# Altium PCB 2026.11.05.HMS.PD.CNHH.V5.1.PcbDoc (part 1 of 4)
Units mm, origin at the board's own origin, x right, y up, seen from the top; angles counter-clockwise.
Board outline 110 x 110 mm, 2 copper layers (Top Layer, Bottom Layer); 170 components, 117 nets, 610 pads, 1348 vias.
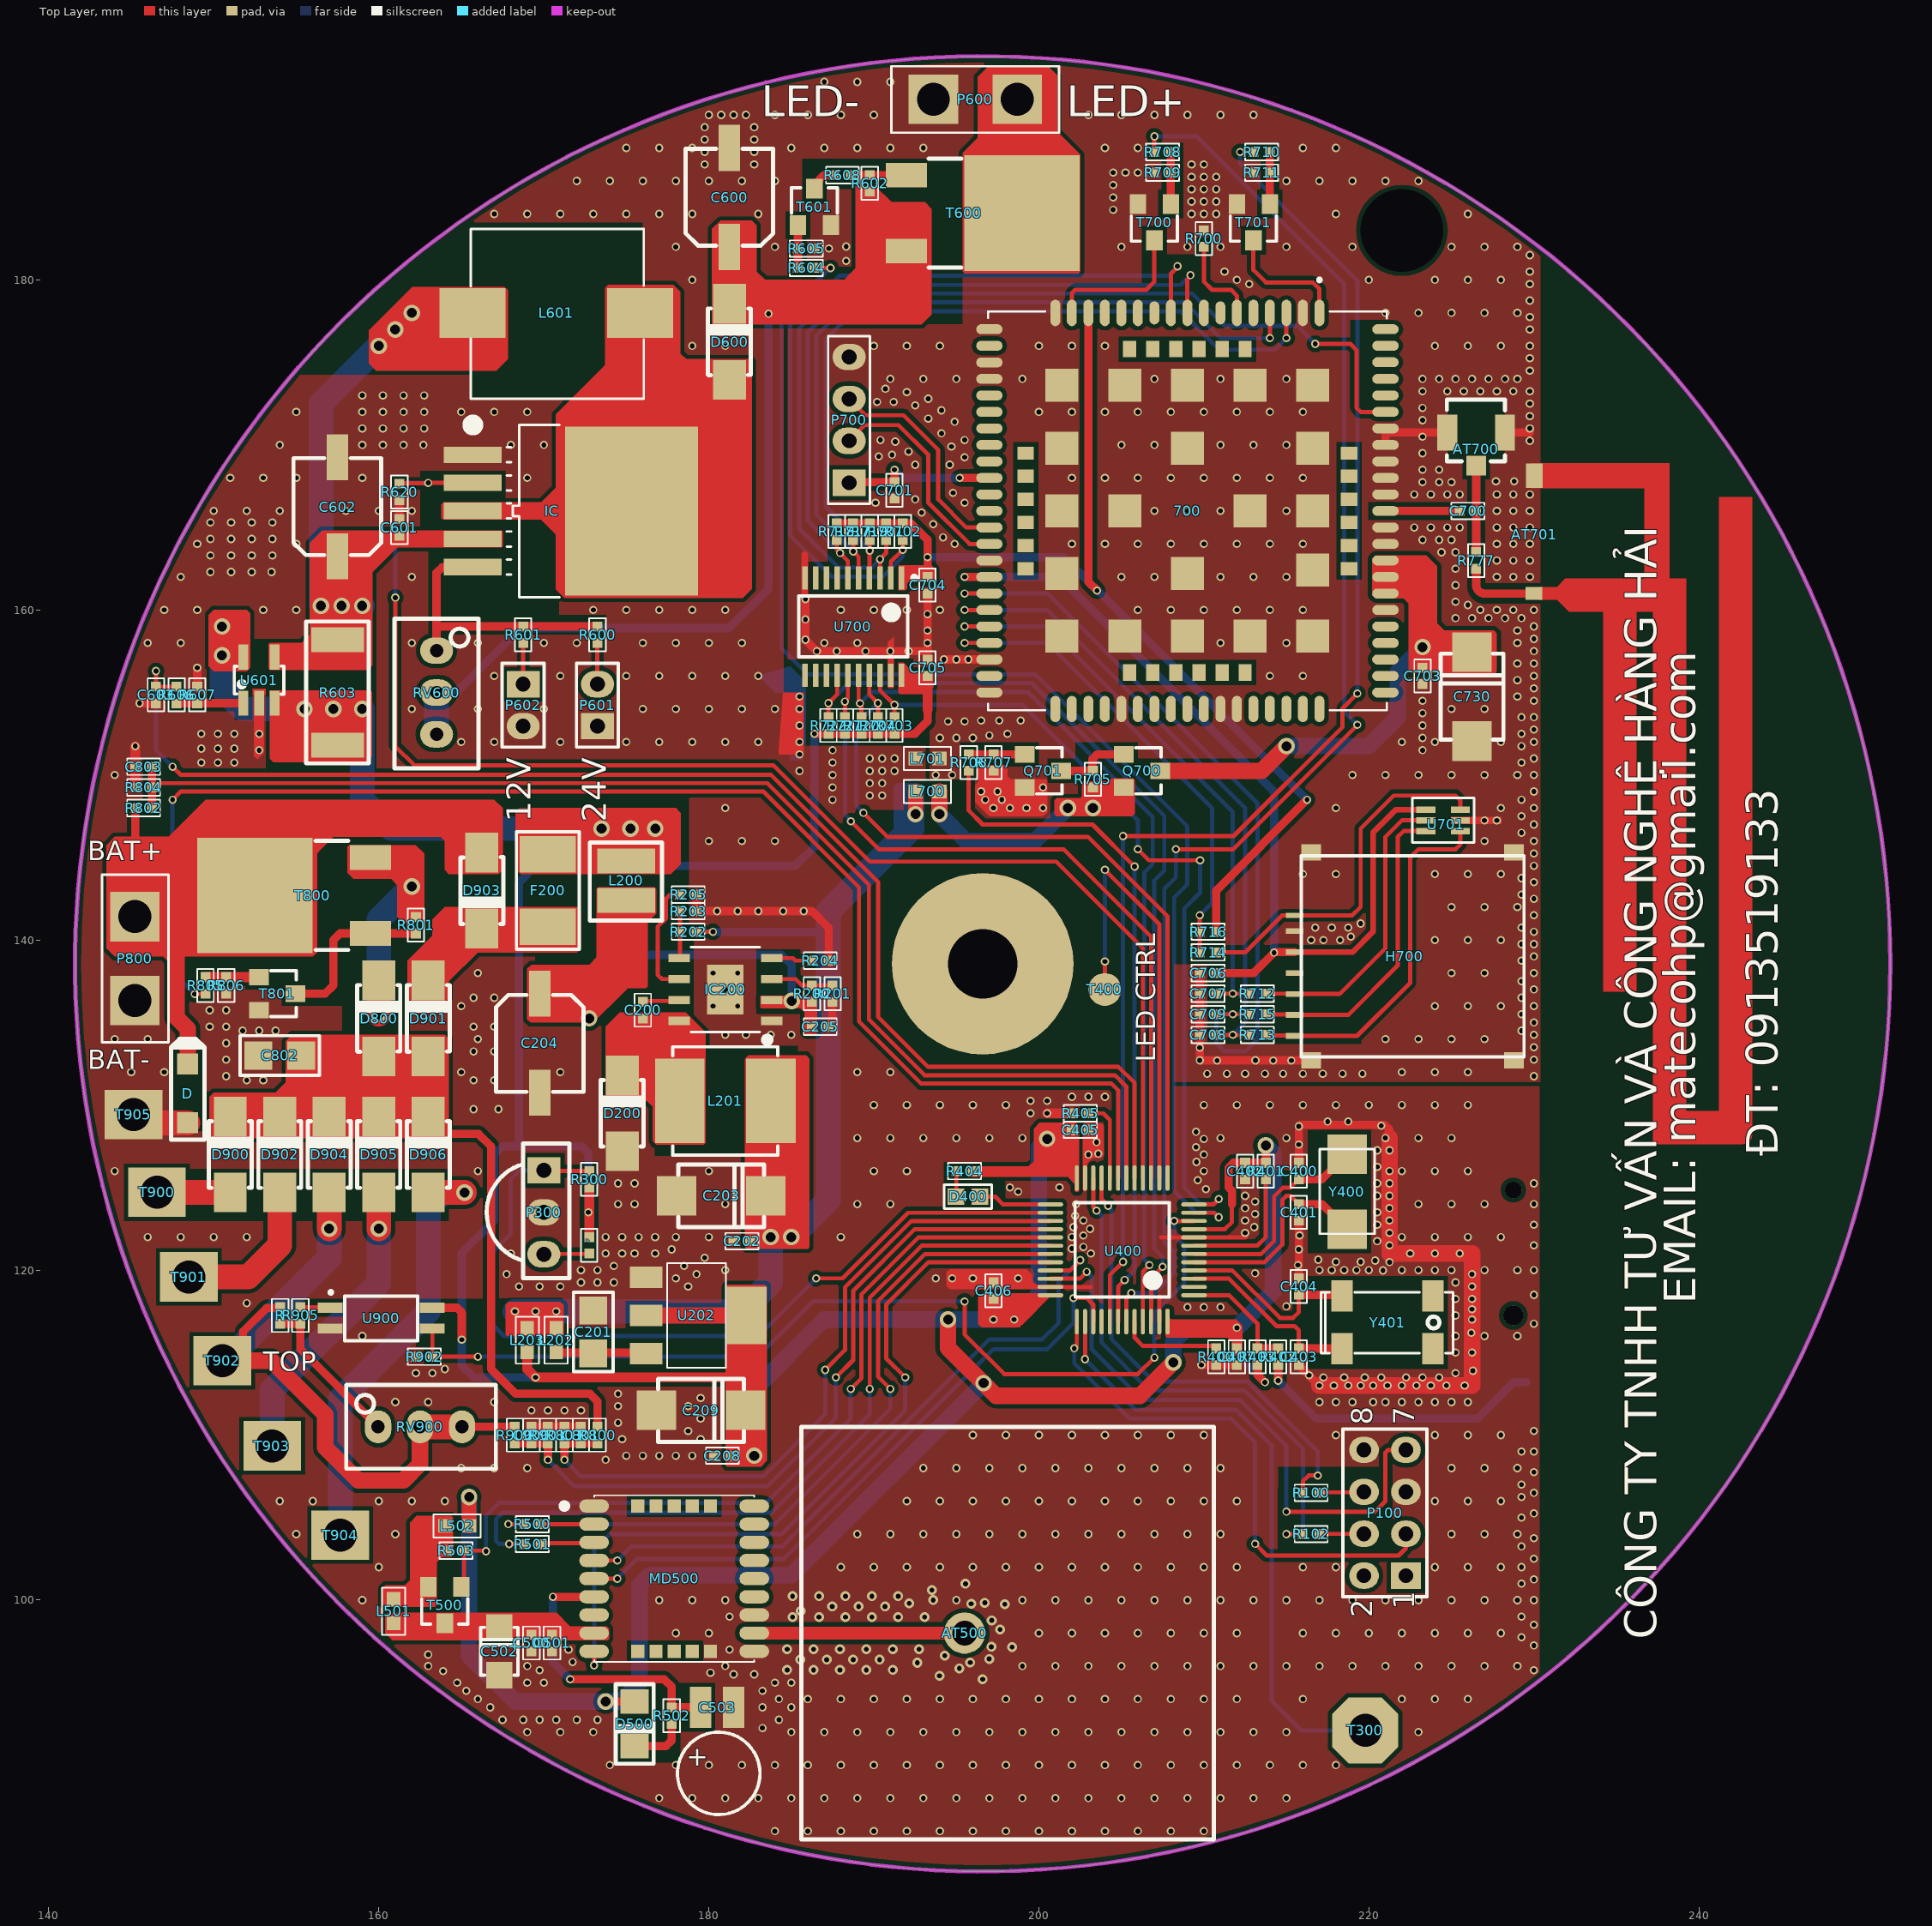
[diagram p0: Top Layer view]
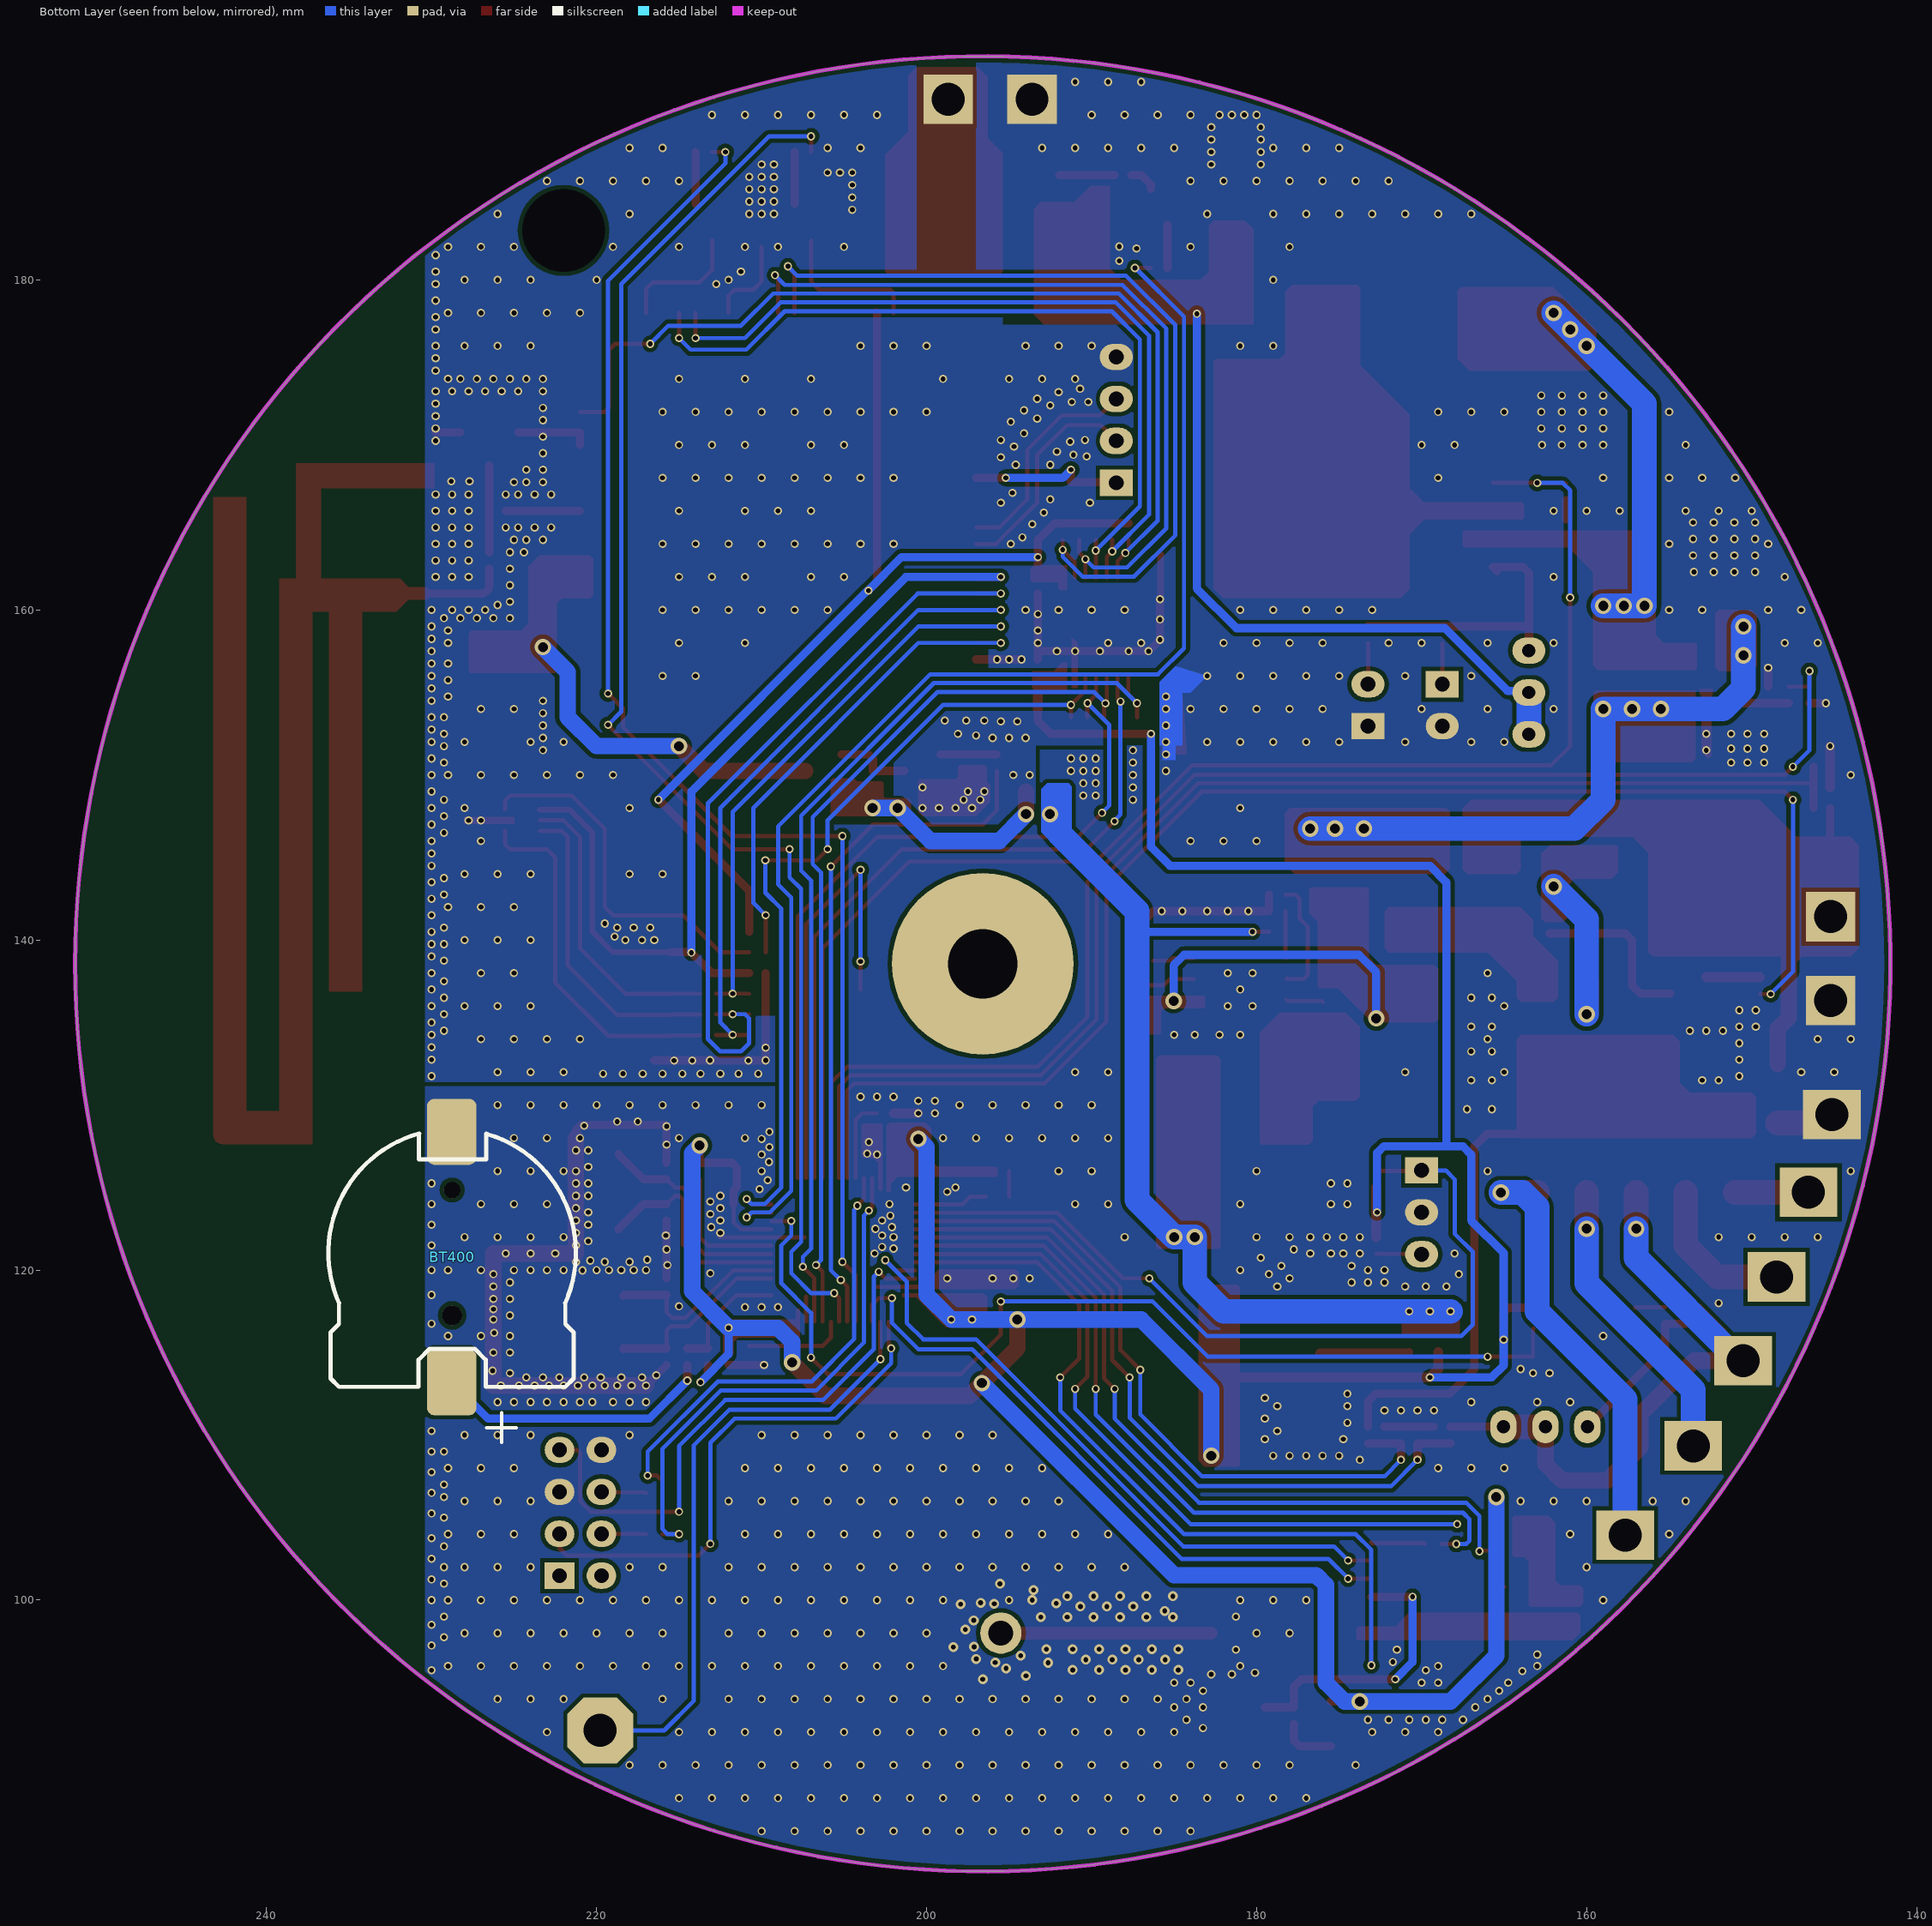
[diagram p1: Bottom Layer view, seen from below]
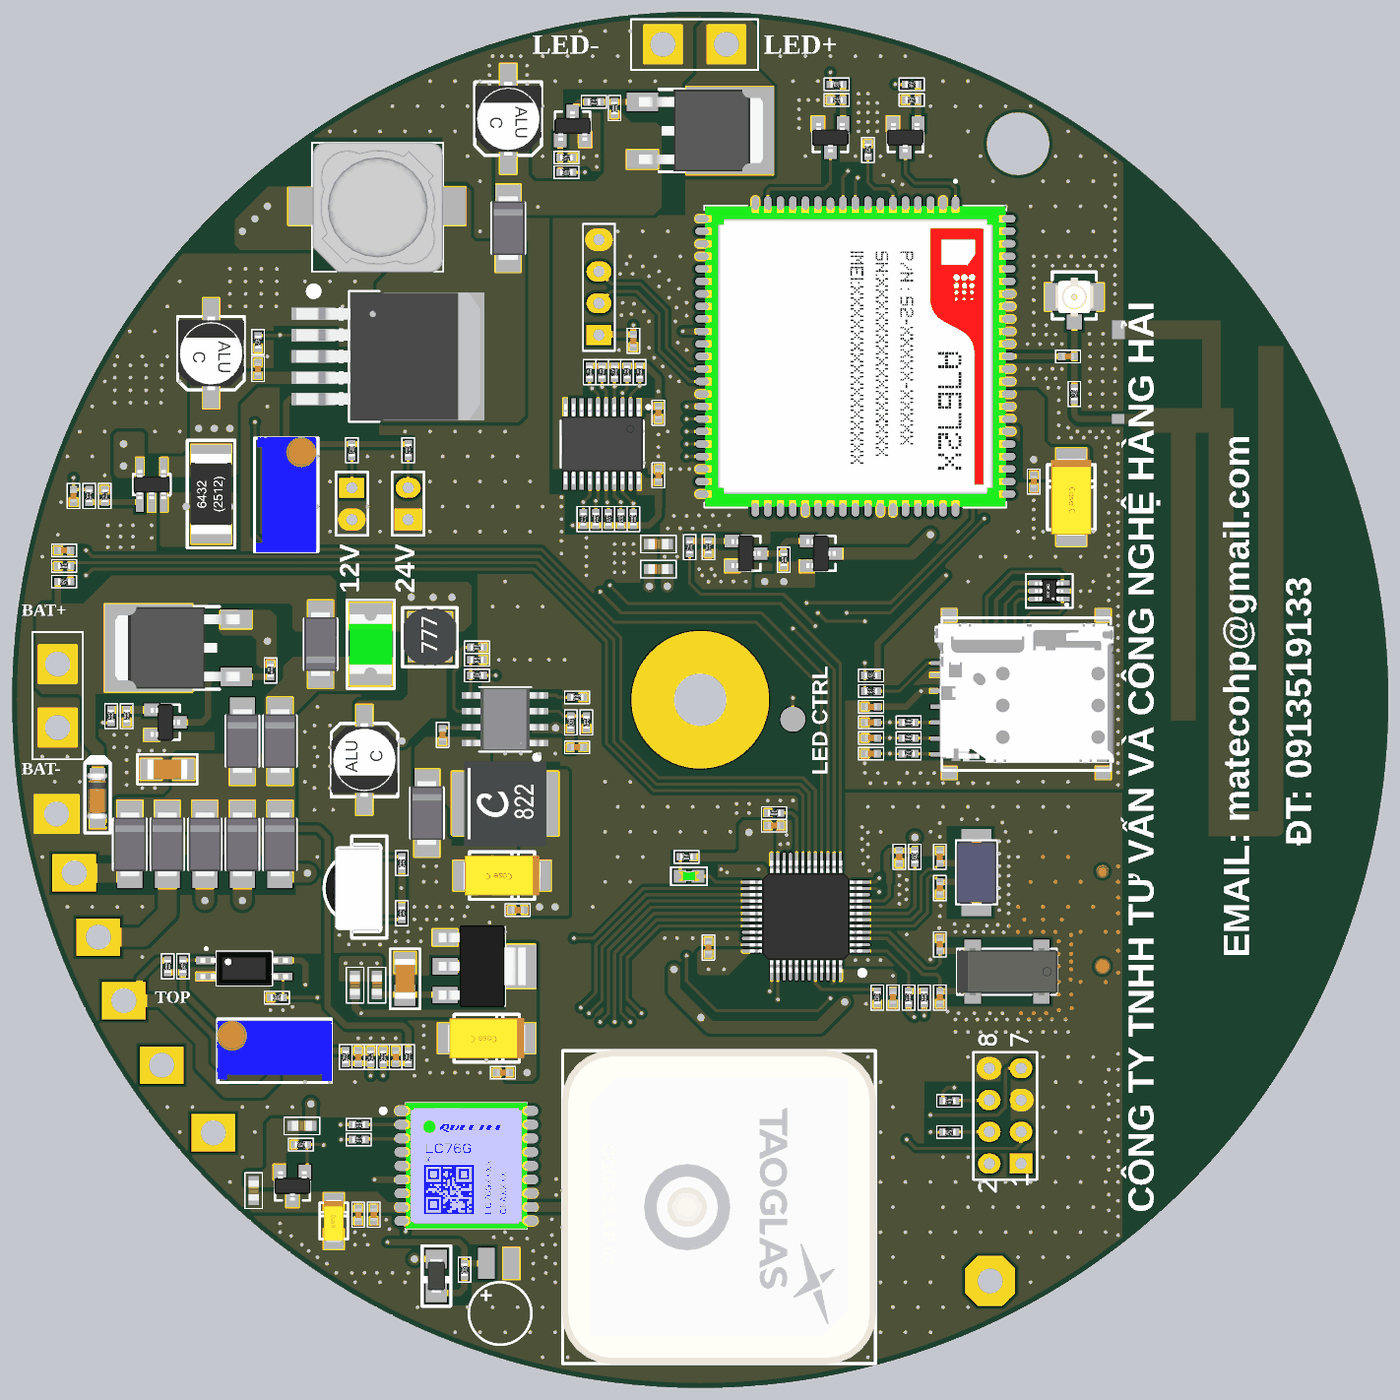
[diagram p4: 3D render of the assembled board from above, using the file's embedded part models]

## Layer stack, top to bottom
Top Solder: solder mask 0.0102, Solder Resist, Dk 3.5
Top Layer: signal copper 0.0356
Dielectric 1: dielectric 0.32, FR-4, Dk 4.8
Bottom Layer: signal copper 0.0356
Bottom Solder: solder mask 0.0102, Solder Resist, Dk 3.5

## Board outline
141.596,138.557 ccw(c196.596,138.557) 196.596,83.557 ccw(c196.596,138.557) 251.596,138.557 ccw(c196.596,138.557) 196.596,193.557 ccw(c196.596,138.557)

## Design rules (kind name [scope] priority, off if disabled: settings)
Clearance [not InComponent('U400','U701')] p1: gap=0.254 ignorepadtopadclearanceinfootprint=FALSE except(0: Arc-Hole Track-Hole SMDPad-Hole THPad-Hole Via-Hole Fill-Hole Poly-Hole Region-Hole Text-Hole)
ComponentClearance [All] p1: gap=0 collisioncheckmode=3 verticalgap=0 showdistances=FALSE
HoleSize [All] p1: absolutevalues=TRUE maxlimit=25 minlimit=0.025 maxpercent=80.000 minpercent=20.000
PlaneConnect [All] p1: planeconnectstyle=Direct reliefexpansion=0.508 reliefentries=4 reliefconductorwidth=0.254 reliefairgap=0.254
PolygonConnect [All] p1: connectstyle=Direct reliefconductorwidth=0.254 reliefentries=4 polygonreliefangle="90 Angle" airgapwidth=0.254
RoomDefinition U_HMS.SIM.A7677S [InComponentClass('U_HMS.SIM.A7677S')] p1: confinementstyle=ConfineIn formatcopy=TRUE lockcomponents=FALSE outline 0,0 50.8,0 50.8,25.4 0,25.4
RoomDefinition U_HMS.LC76G [InComponentClass('U_HMS.LC76G')] p2: confinementstyle=ConfineIn formatcopy=TRUE lockcomponents=FALSE outline 0,0 50.8,0 50.8,25.4 0,25.4
RoomDefinition HMS_Solar [InComponentClass('HMS_Solar')] p3: confinementstyle=ConfineIn formatcopy=TRUE lockcomponents=FALSE outline 0,0 50.8,0 50.8,25.4 0,25.4
RoomDefinition HMS_NiMHCharge [InComponentClass('HMS_NiMHCharge')] p4: confinementstyle=ConfineIn formatcopy=TRUE lockcomponents=FALSE outline 0,0 50.8,0 50.8,25.4 0,25.4
RoomDefinition HMS.VS1838B [InComponentClass('HMS.VS1838B')] p5: confinementstyle=ConfineIn formatcopy=TRUE lockcomponents=FALSE outline 0,0 50.8,0 50.8,25.4 0,25.4
RoomDefinition HMS.STM32L151CBT6 [InComponentClass('HMS.STM32L151CBT6')] p6: confinementstyle=ConfineIn formatcopy=TRUE lockcomponents=FALSE outline 0,0 50.8,0 50.8,25.4 0,25.4
RoomDefinition HMS.Power [InComponentClass('HMS.Power')] p7: confinementstyle=ConfineIn formatcopy=TRUE lockcomponents=FALSE outline 0,0 50.8,0 50.8,25.4 0,25.4
RoomDefinition HMS.LedCtrl [InComponentClass('HMS.LedCtrl')] p8: confinementstyle=ConfineIn formatcopy=TRUE lockcomponents=FALSE outline 0,0 50.8,0 50.8,25.4 0,25.4
RoomDefinition HMS.Bootloader [InComponentClass('HMS.Bootloader')] p9: confinementstyle=ConfineIn formatcopy=TRUE lockcomponents=FALSE outline 0,0 50.8,0 50.8,25.4 0,25.4
RoutingVias [All] p1: holewidth=0.4 width=8 viastyle="Through Hole" minholewidth=0.3 minwidth=0.5 maxholewidth=0.6 maxwidth=1
SilkToSilkClearance [All] p1: silktosilkclearance=0
SilkToSolderMaskClearance [IsPad] p1: minsilkscreentomaskgap=0 clearancetoexposedcopper=TRUE
SolderMaskExpansion [All] p1: expansion=0.102 istentingtop=FALSE
Width [All] p1: maxlimit=1.5 minlimit=0.254 preferedwidth=0.5
25 further rules are at their usual default settings.

## Classes and differential pairs
component class HMS.VS1838B: ` P300 R300 T300
component class HMS_Solar: C900 D900 D901 D902 D903 D904 D905 D906 R R900 R901 R902 R905 RV900 T900 T901 T902 T903 T904 T905 U900
component class HMS_NiMHCharge: C801 C802 C803 D D800 P800 R800 R801 R802 R803 R804 R805 R806 T800 T801
component class U_HMS.SIM.A7677S: 700 AT700 AT701 C700 C701 C703 C704 C705 C706 C707 C708 C709 C730 g H700 L700 L701 P700 Q700 Q701 R700 R701 R702 R703 R704 R705 R706 R707 R708 R709 R710 R711 R712 R713 R714 R715 R716 R717 R718 R719 R720 R721 R722 R777 T700 T701 U700 U701
component class HMS.STM32L151CBT6: BT400 C400 C401 C402 C403 C404 C405 C406 C407 D400 R400 R401 R402 R403 R404 R405 T400 U400 Y400 Y401
component class HMS.Power: C200 C201 C202 C203 C204 C205 C208 C209 D200 F200 IC200 L200 L201 L202 L203 R200 R201 R202 R203 R204 R205 U202
component class HMS.LedCtrl: C600 C601 C602 C603 D600 IC L601 P600 P601 P602 R600 R601 R602 R603 R604 R605 R606 R607 R608 R620 RV600 T600 T601 U601
component class U_HMS.LC76G: AT500 C500 C501 C502 C503 D500 L501 L502 MD500 R500 R501 R502 R503 T500
component class HMS.Bootloader: P100 R100 R102
net class 50Ohm: NetAT500_1

## Components (designator, comment, footprint, x,y, rotation, side; value= is the part's Value field where it differs from the comment)
700 "A767S2 S2-10AG4-Z31JP" SIM_A7672 217,178 r270 top
` "100R" RES_0402(1005) 172.75,121.5 r270 top
AT500 "GPS Antenna" "ANT GPS Passive" 195.5,98 r180 top
AT700 "NC" "IPEX SMD" 226.5,168.75 r270 top
AT701 "LTE Antenna" "Antenna LTE/4G PCB" 230,161 r0 top
BT400 "NC" "DE PIN NHO 3V3" 228.75,121.05 r270 bottom locked
C200 "104/50V" CAP_CERAMIC_0402(1005) 176,135.75 r90 top
C201 "106/50V" CAP_CERAMIC_1206(3216-18) 173,116.25 r270 top
C202 "104/50V" CAP_CERAMIC_0402(1005) 182,121.75 r0 top
C203 "107/10V" CAP_TANTAL_2312(6032-28) 180.75,124.5 r180 top
C204 "10uF/50V" CAP_ALUM_SMD_5054_TYPE_C 169.75,133.75 r90 top
C205 "104/50V" CAP_CERAMIC_0402(1005) 186.75,134.75 r180 top
C208 "104/50V" CAP_CERAMIC_0402(1005) 180.825,108.75 r0 top
C209 "107/10V" CAP_TANTAL_2312(6032-28) 179.525,111.5 r180 top
C400 "20pF/50V" CAP_CERAMIC_0402(1005) 215.75,126 r270 top
C401 "20pF/50V" CAP_CERAMIC_0402(1005) 215.75,123.5 r90 top
C402 "104/50V" CAP_CERAMIC_0402(1005) 212.5,126 r90 top
C403 "10pF/50V" CAP_CERAMIC_0402(1005) 215.75,114.75 r90 top
C404 "10pF/50V" CAP_CERAMIC_0402(1005) 215.75,119 r270 top
C405 "104/50V" CAP_CERAMIC_0402(1005) 202.5,128.5 r180 top
C406 "104/50V" CAP_CERAMIC_0402(1005) 197.25,118.75 r270 top
C407 "104/50V" CAP_CERAMIC_0402(1005) 212,114.75 r90 top
C500 "104/50V" CAP_CERAMIC_0402(1005) 169.25,97.4 r90 top
C501 "10pF/50V" CAP_CERAMIC_0402(1005) 170.5,97.4 r90 top
C502 "107/10V" CAP_TANTAL_1206(3216-18) 167.3,96.9 r270 top
C503 "NC" SPCAP0.22F 180.5,93.5 r180 top
C600 "10uF/50V" CAP_ALUM_SMD_5054_TYPE_C 181.25,185 r270 top
C601 "104/50V" CAP_CERAMIC_0402(1005) 161.25,165 r270 top
C602 "10uF/50V" CAP_ALUM_SMD_5054_TYPE_C 157.5,166.25 r270 top
C603 "104/50V" CAP_CERAMIC_0402(1005) 146.5,154.85 r90 top
C700 "100pF/50V" CAP_CERAMIC_0402(1005) 226,166 r180 top
C701 "104/50V" CAP_CERAMIC_0402(1005) 191.25,167.25 r270 top
C703 "104/50V" CAP_CERAMIC_0402(1005) 223.25,156 r90 top
C704 "104/50V" CAP_CERAMIC_0402(1005) 193.25,161.5 r90 top
C705 "104/50V" CAP_CERAMIC_0402(1005) 193.25,156.5 r270 top
C706 "104/50V" CAP_CERAMIC_0402(1005) 210.25,138 r0 top
C707 "20pF/50V" CAP_CERAMIC_0402(1005) 210.25,136.75 r0 top
C708 "20pF/50V" CAP_CERAMIC_0402(1005) 210.25,134.25 r0 top
C709 "20pF/50V" CAP_CERAMIC_0402(1005) 210.25,135.5 r0 top
C730 "107/10V" CAP_TANTAL_2312(6032-28) 226.25,154.75 r270 top
C801 "104/50V" CAP_CERAMIC_0402(1005) 172.25,110 r270 top
C802 "106/50V" CAP_CERAMIC_1206(3216-18) 154,133 r180 top
C803 "104/50V" CAP_CERAMIC_0402(1005) 145.75,150.5 r0 top
C900 "104/50V" CAP_CERAMIC_0402(1005) 169.25,110 r270 top
D "TZMC30-GS08" SOD-80 148.298,128.798 r0 top
D200 "SS34" DO214AC_SMA_1808 174.75,129.5 r90 top
D400 "LED Red" LED_0603_GREEN 195.7,124.45 r0 top
D500 "1N4148W" DIODE_F03_1005 175.5,92.5 r270 top
D600 "SS54" DO214AC_SMA_1808 181.25,176.25 r90 top
D800 "SS34" DO214AC_SMA_1808 160,135.25 r90 top
D900 "SS34" DO214AC_SMA_1808 151,127 r90 top
D901 "SS34" DO214AC_SMA_1808 163,135.25 r90 top
D902 "SS34" DO214AC_SMA_1808 154,127 r90 top
D903 "SS34" DO214AC_SMA_1808 166.25,143 r270 top
D904 "SS34" DO214AC_SMA_1808 157,127 r90 top
D905 "SS34" DO214AC_SMA_1808 160,127 r90 top
D906 "SS34" DO214AC_SMA_1808 163,127 r90 top
F200 "1A/33V" MF-MSMF 170.25,143 r90 top
H700 "MUP-C7801-2" MUP-C7801 215.9,132.91 r90 top
IC "XL6019E1" TO-263-5 170.5,166 r270 top
IC200 "RY81020CP8" MK9019 181,137 r180 top
L200 "3.3uH" L2.1A_3.5_3.3 175,143.6 r180 top
L201 "10uH" L3A_7x7x3mm 181,130.25 r0 top
L202 "FBMJ1608HM230NT" Inductor_0603 170.75,115.75 r270 top
L203 "FBMJ1608HM230NT" Inductor_0603 169,115.75 r270 top
L501 "4A/23Ohm" Inductor_0603 160.9,99.323 r270 top
L502 "NC" Inductor_0603 164.75,104.5 r180 top
L601 "33uH" L3A_10x10x4mm 170.75,178 r0 top
L700 "FBMJ1608HM230NT" Inductor_0603 193.25,149 r0 top
L701 "FBMJ1608HM230NT" Inductor_0603 193.25,151 r0 top
MD500 "SIM65M-C" LC76G_GPS 173.05,105.7 r0 top
P100 "NC" HDR2X4 222.24,101.48 r90 top
P300 "VS1838B" IR_RECEIVER 170,123.5 r270 top
P600 "NC" H2_BIG 196.15,190.95 r180 top
P601 "24V" HDR1X2 173.25,154.23 r90 top
P602 "12V" HDR1X2 168.75,154.23 r270 top
P700 "NC" HDR1X4 188.5,171.52 r90 top
P800 "NC" H2_BIG 145.225,138.875 r270 top
Q700 "AO3415" SOT23-3 206.25,150.25 r270 top
Q701 "C1815" SOT23-3 200.25,150.25 r270 top
R "2.7K" RES_0402(1005) 154.025,117.25 r270 top
R100 "1K" RES_0402(1005) 216.5,106.5 r180 top
R102 "1K" RES_0402(1005) 216.5,104 r180 top
R200 "68K" RES_0402(1005) 186.25,136.75 r270 top
R201 "20K" RES_0402(1005) 187.5,136.75 r90 top
R202 "20K" RES_0402(1005) 178.75,140.5 r0 top
R203 "5.1K" RES_0402(1005) 178.75,141.75 r180 top
R204 "20K" RES_0402(1005) 186.75,138.75 r180 top
R205 "NC" RES_0402(1005) 178.75,142.75 r180 top
R300 "10K" RES_0402(1005) 172.75,125.5 r270 top
R400 "100K" RES_0402(1005) 210.75,114.75 r90 top
R401 "100K" RES_0402(1005) 213.75,126 r90 top
R402 "NC" RES_0402(1005) 214.5,114.75 r90 top
R403 "0R" RES_0402(1005) 213.25,114.75 r90 top
R404 "1K" RES_0402(1005) 195.5,126 r180 top
R405 "100K" RES_0402(1005) 202.5,129.5 r0 top
R500 "1K" RES_0402(1005) 169.3,104.6 r180 top
R501 "1K" RES_0402(1005) 169.3,103.4 r180 top
R502 "100R" RES_0402(1005) 177.75,93 r270 top
R503 "10K" RES_0402(1005) 164.675,103 r180 top
R600 "5.1K" RES_0402(1005) 173.25,158.5 r90 top
R601 "10K" RES_0402(1005) 168.75,158.5 r90 top
R602 "10K" RES_0402(1005) 189.75,185.85 r270 top
R603 "0.1R" RES_2512 157.5,155 r90 top
R604 "1K" RES_0402(1005) 185.9,180.725 r180 top
R605 "10K" RES_0402(1005) 185.9,181.9 r180 top
R606 "330R" RES_0402(1005) 147.75,154.85 r90 top
R607 "100K" RES_0402(1005) 149,154.85 r270 top
R608 "10K" RES_0402(1005) 188.1,186.35 r180 top
R620 "100K" RES_0402(1005) 161.25,167.15 r90 top
R700 "NC" RES_0402(1005) 210,182.5 r270 top
R701 "2K2" RES_0402(1005) 190.75,164.75 r90 top
R702 "2K2" RES_0402(1005) 191.75,164.75 r90 top
R703 "2K2" RES_0402(1005) 191.25,153 r270 top
R704 "2K2" RES_0402(1005) 190.25,153 r270 top
R705 "10K" RES_0402(1005) 203.275,149.75 r270 top
R706 "1K" RES_0402(1005) 195.75,150.75 r270 top
R707 "10K" RES_0402(1005) 197.25,150.75 r90 top
R708 "1K" RES_0402(1005) 207.5,187.75 r180 top
R709 "4.7K" RES_0402(1005) 207.5,186.5 r180 top
R710 "1K" RES_0402(1005) 213.5,187.75 r180 top
R711 "4.7K" RES_0402(1005) 213.5,186.5 r180 top
R712 "0R" RES_0402(1005) 213.25,136.75 r0 top
R713 "0R" RES_0402(1005) 213.25,134.25 r0 top
R714 "0R" RES_0402(1005) 210.25,139.25 r0 top
R715 "0R" RES_0402(1005) 213.25,135.5 r0 top
R716 "4.7K" RES_0402(1005) 210.25,140.5 r0 top
R717 "2K2" RES_0402(1005) 188.75,164.75 r90 top
R718 "2K2" RES_0402(1005) 187.75,164.75 r90 top
R719 "2K2" RES_0402(1005) 189.75,164.75 r90 top
R720 "2K2" RES_0402(1005) 189.25,153 r270 top
R721 "2K2" RES_0402(1005) 188.25,153 r270 top
R722 "2K2" RES_0402(1005) 187.25,153 r270 top
R777 "NC" RES_0402(1005) 226.5,163 r90 top value=0R
R800 "100K" RES_0402(1005) 173.25,110 r90 top
R801 "10K" RES_0402(1005) 162.25,140.9 r90 top
R802 "100K" RES_0402(1005) 145.75,148 r180 top
R803 "10K" RES_0402(1005) 171.25,110 r270 top
R804 "10K" RES_0402(1005) 145.75,149.25 r0 top
R805 "1K" RES_0402(1005) 149.5,137.25 r90 top
R806 "10K" RES_0402(1005) 150.75,137.25 r90 top
R900 "100K" RES_0402(1005) 168.25,110 r90 top
R901 "10K" RES_0402(1005) 170.25,110 r270 top
R902 "10K" RES_0402(1005) 162.75,114.75 r0 top
R905 "10K" RES_0402(1005) 155.25,117.25 r270 top
RV600 "204" RES_VAR_Type1 163.5,155 r270 top
RV900 "104" RES_VAR_Type1 162.5,110.5 r0 top
T300 "Test Point" TP 219.775,92.1 r0 top
T400 "Test Point" "Test Point SMD" 204,137 r90 top
T500 "AO3415" SOT23-3 164,99.7 r180 top
T600 "AOD409" TO252 197.5,184.05 r270 top
T601 "C1815" SOT23-3 186.4,184.425 r0 top
T700 "C1815" SOT23-3 207,183.5 r180 top
T701 "2SC1815" SOT23-3 213,183.5 r180 top
T800 "AOD409" TO252 153.968,142.7 r90 top
T801 "C1815" SOT23-3 153.85,136.75 r270 top
T900 "Test Point" TP_2 146.558,124.714 r180 top
T901 "Test Point" TP_2 148.488,119.583 r180 top
T902 "Test Point" TP_2 150.52,114.503 r180 top
T903 "Test Point" TP_2 153.543,109.347 r180 top
T904 "Test Point" TP_2 157.671,103.937 r180 top
T905 "Test Point" TP_2 145.15,129.425 r180 top
U202 "TLV1117LV33DCYR" LM1117-SOP 179.25,117.25 r270 top
U400 "STM32L151CBT6" LQFP48_L 205.05,121.225 r180 top locked
U601 "INA138NA/3K" SOT23-5 152.75,155.75 r0 top
U700 "TC7MPB9307FT(EL)" TSOP65P640X120-20N 188.75,159 r270 top
U701 "SMF05CT2G" SOT65P210X140-6N 224.5,147.25 r180 top
U900 "EL3H7(C)(TA)-G" "Opto small" 160.5,117.25 r0 top
Y400 "8Mhz" CRYSTAL_SMD_2PIN-5032 218.675,124.75 r90 top
Y401 "32.768KHz" ABS25-32768-6-T 221.125,116.825 r0 top

## Footprints (in the part's own frame and the unit in brackets; to place one, negate y for a bottom-side part, rotate by r counter-clockwise, add the part's x,y. Pads: shape width x height; smd on the part's side, far side on the other; paste and mask are expansions set on the pad)
ABS25-32768-6-T [mm] "CRYSTAL 32.768KHZ 6PF SMD"
  rect 1.3x1.9 smd: 1(-2.75,-1.6) 2(2.75,-1.6) 3(2.75,1.6) 4(-2.75,1.6)
  silkscreen extent -4.02,-1.85 3.98,1.83, body extent -4,-1.9 4,1.9, height 2.53
"ANT GPS Passive" [mm]
  round 2.5 hole 1.5: 1(0,0)
  silkscreen extent -15.1,-12.5 9.9,12.5, body extent -15.15,-12.55 9.95,12.55, height 4.73
"Antenna LTE/4G PCB" [mm]
  rect 1x0.77 smd paste+0 mask+0: 1(0,0)
  rect 1x1.5 smd paste+0 mask+0: 2(0.026,7.138)
  Top Layer region: 0.254,-0.38 1.397,-0.38 2.131,-1.114 4.216,-1.114 4.216,-24.126 6.215,-24.126 6.215,-1.114 7.216,-1.114 7.216,-33.362 12.67,-33.362 12.879,-33.32 13.056,-33.202 13.174,-33.025 13.216,-32.816 13.216,-32.816 13.216,5.843 11.214,5.843 11.214,-31.36 9.215,-31.36 9.215,0.888 8.217,0.888 8.217,7.885 -0.178,7.885 -0.178,6.387 6.713,6.387 6.713,0.888 1.902,0.888 1.4,0.385 0.257,0.385 0,0.128 0,-0.128
CAP_ALUM_SMD_5054_TYPE_C [mm]
  rect 2.8x1.3 smd: 1(3,0) 2(-3,0)
  silkscreen extent -2.95,-2.67 2.92,2.65, body extent -2.95,-2.65 2.95,2.65, height 5.41
CAP_CERAMIC_0402(1005) [mm] "Chip Inductor, Body 1.0x0.5mm, IPC High Density"
  rect 0.6x0.6 smd: 1(-0.5,0) 2(0.5,0)
  silkscreen extent -1,-0.5 1,0.5, body extent -0.5,-0.25 0.5,0.25, height 0.5
CAP_CERAMIC_1206(3216-18) [mm] "Chip Capacitor, Body 3.2x1.6mm, IPC High Density"
  rect 1.7x1.7 smd: 1(-1.3,0) 2(1.3,0)
  silkscreen extent -2.4,-1.2 2.4,1.2, body extent -1.6,-0.8 1.6,0.8, height 1
CAP_TANTAL_1206(3216-18) [mm] "Chip Capacitor, Body 3.2x1.6mm, IPC High Density"
  rect 1.6x1.6 smd: 1(-1.45,0) 2(1.45,0)
  silkscreen extent -1.45,-1.12 1.45,1.12, body extent -1.7,-0.8 1.7,0.8, height 1.65
CAP_TANTAL_2312(6032-28) [mm] "Chip Resistor, Body 6.0x3.2mm, IPC High Density"
  rect 2.4x2.4 smd: 1(-2.7,0) 2(2.7,0)
  silkscreen extent -2.6,-1.91 2.6,1.91, body extent -3.09,-1.6 3.09,1.6, height 2.69
CRYSTAL_SMD_2PIN-5032 [mm] "Crystal smd"
  rect 2.4x2.4 smd mask+0.025: 1(-2.275,0) 2(2.275,0)
  silkscreen extent -2.55,-1.67 2.58,1.65, body extent -2.5,-1.6 2.5,1.6, height 1.3
"DE PIN NHO 3V3" [mm]
  rrect30% 4x3 smd mask+0.051: 1(7.85,-0.025) 2(-7.325,-0.025)
  round 1 hole 1 unplated paste+0 mask+0: ""(-3.8,0)
  round 1.2 hole 1.2 unplated mask+0: ""(3.8,0)
  silkscreen extent -7.23,-7.5 11.5,7.5, body extent -9,-7.5 9.5,7.49, height 3.92
DIODE_F03_1005 [mm]
  rect 1.5x1.7 smd: 1(-1.35,0) 2(1.35,0)
  silkscreen extent -2.4,-1.14 2.41,1.16, body extent -1.35,-0.7 1.35,0.7, height 0.73
DO214AC_SMA_1808 [mm] "Diode B340, Diode M7"
  rect 2.4x2 smd: 1(-2.3,0) 2(2.3,0)
  silkscreen extent -2.02,-1.3 2.02,1.3, body extent -2.6,-1.3 2.6,1.3, height 2.42
H2_BIG [mm] "Euro Block"
  rect 3x3 hole 2: 1(-2.54,0) 2(2.54,0)
  silkscreen extent -5.08,-2 5.08,2.03, body extent -3.81,-1.27 3.81,1.27, height 1.5
HDR1X2 [mm] "Connector; Header; 2 Position"
  rect 1.6x2 hole 0.9: 1(-1.27,0)
  oval 1.6x2 hole 0.9: 2(1.27,0)
  silkscreen extent -2.54,-1.27 2.54,1.27, body extent -2.54,-1.27 2.54,1.27, height 7
HDR1X4 [mm] "Connector; Header; 4 Position"
  rect 1.6x2 hole 0.9: 1(-3.81,0)
  oval 1.6x2 hole 0.9: 2(-1.27,0) 3(1.27,0) 4(3.81,0)
  silkscreen extent -5.08,-1.27 5.08,1.27, body extent -5.08,-1.27 5.08,1.27, height 7
HDR2X4 [mm] "Connector; Header; 4x2 Position"
  rect 1.6x1.8 hole 0.9: 1(0,0)
  oval 1.6x1.8 hole 0.9: 2(0,2.54) 3(2.54,0) 4(2.54,2.54) 5(5.08,0) 6(5.08,2.54) 7(7.62,0) 8(7.62,2.54)
  silkscreen extent -1.27,-1.27 8.89,3.81, body extent -1.27,-1.27 8.89,3.81, height 7
Inductor_0603 [mil] "HK1608R22J-T"
  rect 34x32 smd paste+0 mask+0: 1(-28.54,0) 2(28.46,0)
  silkscreen extent -56,-28 56,28, body extent -32,-16 31,16, height 37
"IPEX SMD" [mm] "IPEX Connector SMD"
  rect 1.2x1.2 smd: 1(0,0)
  rect 2.2x1.2 smd: 2(-2,1.75) 2(-2,-1.75)
  silkscreen extent -4,-1.78 -0.25,1.75, body extent -3.55,-1.5 -0.45,1.5, height 1.25
IR_RECEIVER [mm] "TO, Flat Index; 3 In-Line, Axial Leads; Body Dia. 4.8mm; Leads 0.55 x 0.51 mm (max)"
  rect 1.6x2 hole 0.9: 1(-2.54,0)
  oval 1.6x2 hole 0.9: 2(0,0) 3(2.54,0)
  silkscreen extent -4.17,-3.46 3.99,1.55, body extent -3.62,-3.6 3.62,1.2, height 8.8
L2.1A_3.5_3.3 [mm]
  rect 3.5x1.5 smd: 1(0,-1.2) 2(0,1.2)
  silkscreen extent -2.16,-2.31 2.21,2.41, body extent -2.1,-2.31 2.1,2.31, height 3.47
L3A_7x7x3mm [mm]
  rect 3x5.12 smd: 1(-2.764,0) 2(2.764,0)
  silkscreen extent -3.18,-3.28 3.18,3.28, body extent -3.28,-3.38 3.28,3.38, height 6.1
L3A_10x10x4mm [mm]
  rect 4x3 smd: 1(-5.08,0) 2(5.08,0)
  silkscreen extent -5.18,-5.21 5.31,5.08, body extent -5.12,-5.28 5.28,5.12, height 6.25
LC76G_GPS [mm] "Modlue GNSS"
  rrect100% 1.8x0.8 smd mask+0.05: 1(0,0) 2(0,-1.1) 3(0,-2.2) 4(0,-3.3) 5(0,-4.4) 6(0,-5.5) 7(0,-6.6) 8(0,-7.7) 9(0,-8.8) 10(9.7,-8.8) 11(9.7,-7.7) 12(9.7,-6.6) 13(9.7,-5.5) 14(9.7,-4.4) 15(9.7,-3.3) 16(9.7,-2.2) 17(9.7,-1.1) 18(9.7,0)
  rect 0.8x0.8 smd mask+0.05: 19(7.05,0) 20(5.95,0) 21(4.85,0) 22(3.75,0) 23(2.65,0) 24(2.65,-8.8) 25(3.75,-8.8) 26(4.85,-8.8) 27(5.95,-8.8) 28(7.05,-8.8)
  silkscreen extent -1.9,-9.45 9.7,0.65, body extent 0,-9.45 9.7,0.65, height 2.4
LED_0603_GREEN [mm] "Chip Capacitor, Body 1.6x0.8mm, IPC High Density"
  rect 1x1 smd: 1(-0.725,0) 2(0.725,0)
  silkscreen extent -1.45,-0.73 1.45,0.72, body extent -0.8,-0.4 0.8,0.4, height 0.6
LM1117-SOP [mm]
  rect 1.3x2 smd: 1(-2.3,-3.048) 2(0,-3.048) 3(2.3,-3.048)
  rect 3.5x2.4 smd: 2(0,3.048)
  silkscreen extent -3.18,-1.78 3.18,1.78, body extent -3.25,-3.56 3.25,3.4, height 1.68
LQFP48_L [mm] "Thin QFP, 48-Leads, Body 7x7mm, Pitch 0.5mm, IPC High Density"
  round 0.8 on Top Overlay: 0(-4.5,4.5)
  oval 1.55x0.25 smd: 1(-4.35,2.75) 2(-4.35,2.25) 3(-4.35,1.75) 4(-4.35,1.25) 5(-4.35,0.75) 6(-4.35,0.25) 7(-4.35,-0.25) 8(-4.35,-0.75) 9(-4.35,-1.25) 10(-4.35,-1.75) 11(-4.35,-2.25) 12(-4.35,-2.75) 25(4.35,-2.75) 26(4.35,-2.25) 27(4.35,-1.75) 28(4.35,-1.25) 29(4.35,-0.75) 30(4.35,-0.25) 31(4.35,0.25) 32(4.35,0.75) 33(4.35,1.25) 34(4.35,1.75) 35(4.35,2.25) 36(4.35,2.75)
  oval 0.25x1.55 smd: 13(-2.75,-4.35) 14(-2.25,-4.35) 15(-1.75,-4.35) 16(-1.25,-4.35) 17(-0.75,-4.35) 18(-0.25,-4.35) 19(0.25,-4.35) 20(0.75,-4.35) 21(1.25,-4.35) 22(1.75,-4.35) 23(2.25,-4.35) 24(2.75,-4.35) 37(2.75,4.35) 38(2.25,4.35) 39(1.75,4.35) 40(1.25,4.35) 41(0.75,4.35) 42(0.25,4.35) 43(-0.25,4.35) 44(-0.75,4.35) 45(-1.25,4.35) 46(-1.75,4.35) 47(-2.25,4.35) 48(-2.75,4.35)
  silkscreen extent -2.85,-2.85 2.85,2.85, body extent -4.5,-4.5 4.5,4.5, height 1.6
MF-MSMF [mm]
  rect 2.2x3.4 smd: 1(-2.2,0) 2(2.2,0)
  silkscreen extent -3.56,-1.91 3.56,1.91, body extent -2.36,-1.74 2.37,1.74, height 1.03
MK9019 [mm]
  rect 1.3x0.508 smd paste+0 mask+0: 1(-2.803,1.905) 2(-2.803,0.635) 3(-2.803,-0.635) 4(-2.803,-1.905) 5(2.803,-1.905) 6(2.803,-0.635) 7(2.803,0.635) 8(2.803,1.905)
  rect 2.2x3 smd paste+0 mask+0: EPAD(0,0)
  silkscreen extent -2.67,-2.58 2.08,3.17, body extent -3.1,-2.45 3.1,2.45, height 1.76
MUP-C7801 [mm] "Push-Push NANO-SIM Card"
  rect 0.35x1.04 smd: 1(6.36,0.4) 2(3.82,0.4) 3(1.28,0.4) 5(7.63,0.4) 6(5.09,0.4) 7(2.55,0.4)
  rect 1x1.2 smd: 5(-0.2,-0.6) 5(-0.2,-12.9) 5(12.4,-0.6) 5(12.4,-12.9)
  rect 0.3x1.04 smd: 8(8.58,0.4)
  silkscreen extent 0,-13.5 12.2,0, body extent 0.57,-13.75 11.79,0.6, height 1.25
"Opto small" [mm]
  rect 1.5x0.6 smd: 1(-3.454,0.468) 2(-3.454,-0.802) 3(2.746,-0.802) 4(2.746,0.468)
  silkscreen extent -3.5,-1.53 1.85,1.5, body extent -3.85,-1.53 3.15,1.17, height 2.01
RES_0402(1005) [mm] "Chip Inductor, Body 1.0x0.5mm, IPC High Density"
  rect 0.6x0.6 smd: 1(-0.5,0) 2(0.5,0)
  silkscreen extent -1,-0.5 1,0.5, body extent -0.5,-0.25 0.5,0.25, height 0.35
RES_2512 [mm]
  rect 1.5x3.2 smd: 1(-3.2,0) 2(3.2,0)
  silkscreen extent -4.3,-1.9 4.3,1.9, body extent -3.2,-1.6 3.2,1.6, height 0.6
RES_VAR_Type1 [mm] "Bien tro vi chinh"
  oval 1.6x2 hole 0.8: 1(-2.54,0) 2(0,0) 3(2.54,0)
  silkscreen extent -4.47,-2.54 4.6,2.54, body extent -4.54,-2.4 4.66,2.4, height 12.02
SIM_A7672 [mm]
  oval 1.6x0.6 smd: 1(0,0) 2(0,-1) 3(0,-2) 4(0,-3) 5(0,-4) 6(0,-5) 8(0,-7) 9(0,-8) 10(0,-9) 12(0,-11) 13(0,-12) 14(0,-13) 15(0,-14) 16(0,-15) 17(0,-16) 35(24,-16) 36(24,-15) 37(24,-14) 38(24,-13) 39(24,-12) 40(24,-11) 41(24,-10) 42(24,-9) 43(24,-8) 44(24,-7) 45(24,-6) 46(24,-5) 47(24,-4) 48(24,-3) 49(24,-2) 50(24,-1) 51(24,0)
  oval 1.4x0.6 smd: 7(0,-6) 11(0,-10)
  oval 0.6x1.6 smd: 18(4,-20) 19(5,-20) 20(6,-20) 21(7,-20) 22(8,-20) 23(9,-20) 24(10,-20) 25(11,-20) 26(12,-20) 27(13,-20) 28(14,-20) 29(15,-20) 30(16,-20) 31(17,-20) 32(18,-20) 33(19,-20) 34(20,-20) 52(20,4) 53(19,4) 54(18,4) 55(17,4) 56(16,4) 57(15,4) 58(14,4) 59(13,4) 60(12,4) 61(11,4) 62(10,4) 63(9,4) 64(8,4) 65(7,4) 66(6,4) 67(5,4) 68(4,4) 89(0.99,-20) 90(1.99,-20) 91(3,-20) 92(21,-20) 93(22,-20) 94(23,-20) 95(23,4) 96(22,4) 97(21,4) 98(2.99,4) 99(1.99,4) 100(0.99,4)
  rect 2x2 smd: 69(4.389,-0.4) 70(4.389,-4.2) 71(4.389,-8) 72(4.389,-11.8) 73(4.389,-15.6) 74(8.189,-15.6) 75(11.989,-15.6) 76(15.789,-15.6) 77(19.589,-15.6) 78(19.589,-11.8) 79(19.589,-8) 80(19.589,-4.2) 81(19.589,-0.4) 82(15.589,-0.4) 83(11.989,-0.4) 84(8.189,-0.4) 85(8.189,-8) 86(11.989,-11.8) 87(15.789,-8) 88(11.989,-4.2)
  rect 1x0.8 smd: 101(2.19,-4.5) 102(2.19,-5.9) 103(2.19,-7.3) 104(2.19,-8.7) 105(2.19,-10.1) 106(2.19,-11.5) 113(21.79,-11.5) 114(21.79,-10.1) 115(21.79,-8.7) 116(21.79,-7.3) 117(21.79,-5.9) 118(21.79,-4.5)
  rect 0.8x1 smd: 107(8.5,-17.8) 108(9.9,-17.8) 109(11.3,-17.8) 110(12.7,-17.8) 111(14.1,-17.8) 112(15.5,-17.8) 119(15.5,1.8) 120(14.1,1.8) 121(12.7,1.8) 122(11.3,1.8) 123(9.9,1.8) 124(8.5,1.8)
  silkscreen extent -2.1,-20.07 24.07,4.08, body extent 0,-20 24,4, height 3.02
SOD-80 [mil]
  rect 50x50 smd: 1(5,5) 2(5,145)
  silkscreen extent -35,-35 45,205, body extent -28,8 35,154, height 59
SOT23-3 [mm]
  round 0.5 on Top Overlay: 1(-1.016,0)
  rect 1x1.2 smd: 1(-1,-1.1) 2(1,-1.1) 3(0,1.1)
  silkscreen extent -1.4,-0.38 1.4,1.15, body extent -1.46,-1.17 1.46,1.17, height 1
SOT23-5 [mm]
  rect 0.6x1.524 smd: 1(-0.95,-1.4) 2(0,-1.4) 3(0.95,-1.4) 4(0.95,1.4) 5(-0.95,1.4)
  silkscreen extent -1.5,-0.85 1.5,0.85, body extent -1.46,-1.17 1.46,1.17, height 1
SOT65P210X140-6N [mm] "SOT23, 6-Leads, Body 2.00x2.10mm, Pitch 0.65mm, IPC Medium Density"
  round 0.4 on Top Overlay: 0(-1.4,1.1)
  rect 1.15x0.4 smd: 1(-1.05,0.65) 2(-1.05,0) 3(-1.05,-0.65) 4(1.05,-0.65) 5(1.05,0) 6(1.05,0.65)
  silkscreen extent -1.88,-1.35 1.88,1.35, body extent -1.13,-1 1.13,1, height 1
SPCAP0.22F [mm]
  rect 1.3x2.5 smd: 1(1,0) 2(-1,0)
  silkscreen extent -2.6,1.5 2.4,6.5
"Test Point SMD" [mm]
  round 2 smd: 1(0,0)
TO252 [mm]
  rect 1.5x2.5 smd: 1(-2.3,-5.532) 3(2.3,-5.532)
  rect 7x7 smd: 2(0,1.468)
  silkscreen extent -3.3,-4.19 3.3,-2.2, body extent -3.27,-5.81 3.27,4.13, height 2.41
TO-263-5 [mm]
  rect 1x3.5 smd paste+0 mask+0: 1(-3.4,-4.815) 2(-1.7,-4.815) 3(0,-4.815) 4(1.7,-4.815) 5(3.4,-4.815)
  rect 10.236x8.071 smd paste+0 mask+0: 6(0,4.815)
  silkscreen extent -5.33,-4.93 5.22,0.46, body extent -5.09,-6.19 5.09,8.49, height 4.68
TP [mm] "TestPoint"
  oct 4x4 hole 2: 1(0,0)
TP_2 [mm] "TestPoint"
  rect 3.5x3 hole 2: 1(0,0)
TSOP65P640X120-20N [mm] "TSOP, 20-Leads, Body 6.50x4.40mm, Pitch 0.65mm, IPC Medium Density"
  rect 1.4x0.35 smd: 1(-2.95,2.925) 2(-2.95,2.275) 3(-2.95,1.625) 4(-2.95,0.975) 5(-2.95,0.325) 6(-2.95,-0.325) 7(-2.95,-0.975) 8(-2.95,-1.625) 9(-2.95,-2.275) 10(-2.95,-2.925) 11(2.95,-2.925) 12(2.95,-2.275) 13(2.95,-1.625) 14(2.95,-0.975) 15(2.95,-0.325) 16(2.95,0.325) 17(2.95,0.975) 18(2.95,1.625) 19(2.95,2.275) 20(2.95,2.925)
  silkscreen extent -3.07,-3.3 1.85,3.83, body extent -3.2,-3.25 3.2,3.25, height 1

## Part data
700: library part SIM_A7672, MPN="A767S2 S2-10AG4-Z31JP"
`: library part Res1, "RES 100 OHM 1% 1/8W 0402", MPN=RC0402FR-7W100RL, LatestRevisionDate=17-Jul-2002, LatestRevisionNote="Re-released for DXP Platform.", PackageReference=AXIAL-0.3, Published=8-Jun-2000, Publisher="Altium Limited"
AT500: library part "Antenna GPS Passive", "SWG018-35, Passive antenna 25x25x4mm, pin length 3.5mm, Three-proof varnish", MPN=SW25073IB93
AT700: library part IPEX-AT, "IPEX SMD", MPN=U.FL-R-SMT-1(80)
AT701: library part "Antenna GSM/LTE PCB", MPN=NC
BT400: library part Battery, LatestRevisionDate=17-Jul-2002, LatestRevisionNote="Re-released for DXP Platform.", PackageDescription="Battery; 2 Leads", PackageReference=BAT-2, Published=24-Mar-1999, Publisher="Altium Limited"
C200 C202 C500 C501: library part "Cap Cer 0603 (1608)", "CAP CER 0.1UF 50V X5R 0402", MFR=YAGEO, MPN=CC0402KRX5R9BB104, Category="Ceramic Capacitors", LatestRevisionDate=17-Jul-2002, LatestRevisionNote="Re-released for DXP Platform.", PackageReference=RAD-0.3, Published=8-Jun-2000, Publisher="Altium Limited"
C201: library part CL31A106KOHNNNE, "CAP Ceramic 106/50V 10% 1206", MFR=YAGEO, MPN=CL31A106KBHNNNE
C203 C730: library part "Cap Tantal 2312 (6032-28)", "Capacitor Tantalum 100uF/10V 2312(6032-28)", MPN=TPSC107K010R0100
C204: library part UWT1C221MCL1GS, "Capacitor Alum 10uF/50V SMD 5x5.4mm", Capacitance=220µF, ESR (Equivalent Series Resistance)=-, Lifetime @ Temp.="1000 Hrs @ 105°C", Manufacturer=Nichicon, MPN=AVS106M50C12T-F, Operating Temperature="-55°C ~ 105°C", Package / Case="Radial, Can - SMD", Ripple Current=105mA, Supplier Part Number 1=493-2179-1-ND, Tolerance=±20%, Voltage Rating=16V, Category=Capacitors, ComponentLink1Description=http://www.nichicon.co.jp/english/products/pdfs/e-wt.pdf, ComponentLink1URL=http://www.nichicon.co.jp/english/products/pdfs/e-wt.pdf, Features="General Purpose", Height - Seated (Max)="0.303\" (7.70mm)", Impedance=-, Lead Spacing=-, Manufacturer Part Number=UWT1C221MCL1GS, Mounting Type="Surface Mount", Packaging="Cut Tape (CT)", Pricing 1="1=0.46, 10=0.366, 100=0.2205, 250=0.16536 (USD)", RoHS="RoHS Compliant", Size / Dimension="0.248\" Dia (6.30mm)", Stock 1=45106, Supplier 1=Digi-Key, Surface Mount Land Size="0.260\" L x 0.260\" W (6.60mm x 6.60mm)"
C205 C208: library part Cap, "CAP CER 0.1UF 50V X5R 0402", MPN=CC0402KRX5R9BB104, LatestRevisionDate=17-Jul-2002, LatestRevisionNote="Re-released for DXP Platform.", PackageReference=RAD-0.3, Published=8-Jun-2000, Publisher="Altium Limited"
C209: library part UWT1C221MCL1GS, "Cap Tantal 10uF/6.3V 10% 1206", Capacitance=220µF, ESR (Equivalent Series Resistance)=-, Lifetime @ Temp.="1000 Hrs @ 105°C", Manufacturer=Nichicon, MPN=293D106X96R3A2TE3, Operating Temperature="-55°C ~ 105°C", Package / Case="Radial, Can - SMD", Ripple Current=105mA, Supplier Part Number 1=493-2179-1-ND, Tolerance=±20%, Voltage Rating=6.3V, Category=Capacitors, ComponentLink1Description=http://www.nichicon.co.jp/english/products/pdfs/e-wt.pdf, ComponentLink1URL=http://www.nichicon.co.jp/english/products/pdfs/e-wt.pdf, Features="General Purpose", Height - Seated (Max)="0.303\" (7.70mm)", Impedance=-, Lead Spacing=-, Manufacturer Part Number=UWT1C221MCL1GS, Mounting Type="Surface Mount", Packaging="Cut Tape (CT)", Pricing 1="1=0.46, 10=0.366, 100=0.2205, 250=0.16536 (USD)", RoHS="RoHS Compliant", Size / Dimension="0.248\" Dia (6.30mm)", Stock 1=45106, Supplier 1=Digi-Key, Surface Mount Land Size="0.260\" L x 0.260\" W (6.60mm x 6.60mm)"
C400 C401: library part "Cap Cer 0603 (1608)", "CAP CER 20PF 50V C0G/NP0 0402", MPN=CQ0402FRNPO9BN200, LatestRevisionDate=17-Jul-2002, LatestRevisionNote="Re-released for DXP Platform.", PackageReference=RAD-0.3, Published=8-Jun-2000, Publisher="Altium Limited"
C402 C405 C406 C407: library part C0603C104K5RACTU, "CAP CER 0.1UF 50V X5R 0402", MPN=CC0402KRX5R9BB104, Category=CAPACITOR, CompanyID=VT-00982, Solder=SMT
C403 C404: library part "Cap Cer 0603 (1608)", "CAP CER 10pF 50V NP0 0402", MPN=CC0402JRNPO9BN100, LatestRevisionDate=17-Jul-2002, LatestRevisionNote="Re-released for DXP Platform.", PackageReference=RAD-0.3, Published=8-Jun-2000, Publisher="Altium Limited"
C502: library part "Cap Tantal 2312 (6032-28)", "Cap Tantal 10uF/6.3V 10% 1206", MPN=293D106X96R3A2TE3
C503: library part DCK-3R3E224U-E, Capacitance=220mF, ESR (Equivalent Series Resistance)="200 Ohm", Lifetime @ Temp.="1000 Hrs @ 60°C", MFR="Elna America", Operating Temperature="-10°C ~ 60°C", Package / Case="Coin, Wide Terminals - Opposite Sides", Supplier Part Number 1=604-1007-ND, Tolerance="-20%, +80%", Voltage - Rated=3.3V, Category=Capacitors, ComponentLink1Description=http://media.digikey.com/pdf/Data%20Sheets/Elna%20America%20Inc/DC_DCKe.pdf, ComponentLink1URL=http://media.digikey.com/pdf/Data%20Sheets/Elna%20America%20Inc/DC_DCKe.pdf, Height - Seated (Max)="0.083\" (2.10mm)", LatestRevisionDate=17-Jul-2002, LatestRevisionNote="Re-released for DXP Platform.", Lead Spacing="0.079\" (2.00mm)", Mounting Type="Surface Mount", MPN=NC, PackageDescription="Battery; 2 Leads", PackageReference=BAT-2, Packaging=Bulk, Pricing 1="1=1.41, 10=1.114, 25=1.0208, 50=0.9652, 100=0.8352, 250=0.7424, 500=0.63104, 1000=0.5568, 2500=0.51968 (USD)", Published=24-Mar-1999, Publisher="Altium Limited", RoHS="RoHS Compliant", Size / Dimension="0.268\" Dia (6.80mm)", Stock 1=7810, Supplier 1=Digi-Key
C600 C602: library part "Cap Tantal 2917 (7343-31)", "Capacitor Alum 10uF/50V SMD 5x5.4mm", MPN=AVS106M50C12T-F
C601: library part "Cap Cer 0805 (2012)", "CAP CER 0.1UF 50V X5R 0402", MPN=CC0402KRX5R9BB104, LatestRevisionDate=17-Jul-2002, LatestRevisionNote="Re-released for DXP Platform.", PackageReference=RAD-0.3, Published=8-Jun-2000, Publisher="Altium Limited"
C603 C801 C803 C900: library part "Cap Cer 0603 (1608)", "CAP CER 0.1UF 50V X5R 0402", MPN=CC0402KRX5R9BB104, LatestRevisionDate=17-Jul-2002, LatestRevisionNote="Re-released for DXP Platform.", PackageReference=RAD-0.3, Published=8-Jun-2000, Publisher="Altium Limited"
C700: library part CC0402FRNPO9BN101, "CAP CER 100PF 50V C0G/NPO 0402", MFR=YAGEO, MPN=CC0402JRNPO9BN101, Category="Ceramic Capacitors"
C701 C706: library part CC0603KPX7R9BB104, "CAP CER 0.1UF 50V X5R 0402", MFR=YAGEO, MPN=CC0402KRX5R9BB104, Category="Ceramic Capacitors"
C703: library part C0603C104K5RACTU, "Tụ Ceramic 104/50V 10% 0603", MFR=YAGEO, MPN=CC0603KPX7R9BB104, Category="Ceramic Capacitors", CompanyID=VT-00982, Solder=SMT
C704 C705: library part Cap, "CAP CER 0.1UF 50V X5R 0402", MFR=YAGEO, MPN=CC0402KRX5R9BB104, Category="Ceramic Capacitors", LatestRevisionDate=17-Jul-2002, LatestRevisionNote="Re-released for DXP Platform.", PackageReference=RAD-0.3, Published=8-Jun-2000, Publisher="Altium Limited"
C707 C708 C709: library part CC0402GRNPO9BN200, "CAP CER 20PF 50V C0G/NPO 0402", MFR=YAGEO, Category="Ceramic Capacitors", MPN=CC0402GRNPO9BN200
C802: library part Cap, "CAP Ceramic 106/50V 10% 1206", MPN=CL31A106KBHNNNE, LatestRevisionDate=17-Jul-2002, LatestRevisionNote="Re-released for DXP Platform.", PackageReference=RAD-0.3, Published=8-Jun-2000, Publisher="Altium Limited"
D: "TZM Series 500 mW 32 V 5 % Tolerance Small Signal Zener Diode - SOD-80", Breakdown Voltage=30V, Case/Package=SOD, Current=250mA, Forward Voltage=1.5V, Manufacturer=Vishay, Max Operating Temperature=175°C, Max Power Dissipation=500mW, Max Reverse Leakage Current=100nA, Min Operating Temperature=-65°C, Peak Reverse Current=2µA, Ratings=AEC-Q101, Reverse Standoff Voltage=22V, Test Current=5mA, Tolerance=5%, Working Voltage=32V, Body Material=Glass, Category="Zener Diodes", China RoHS=Non-Compliant, ComponentLink1Description=https://datasheet.octopart.com:443/TZMC30-GS08-Vishay-datasheet-140260254.pdf?src-supplier=Newark, ComponentLink1URL=https://datasheet.octopart.com:443/TZMC30-GS08-Vishay-datasheet-140260254.pdf?src-supplier=Newark, ComponentLink2Description=https://datasheet.octopart.com:443/TZMC30-GS08-Vishay-datasheet-68592862.pdf?src-supplier=Newark, ComponentLink2URL=https://datasheet.octopart.com:443/TZMC30-GS08-Vishay-datasheet-68592862.pdf?src-supplier=Newark, ComponentLink3Description=https://datasheet.octopart.com:443/TZMC30-GS08-Vishay-datasheet-33014479.pdf?src-supplier=Newark, ComponentLink3URL=https://datasheet.octopart.com:443/TZMC30-GS08-Vishay-datasheet-33014479.pdf?src-supplier=Newark, ComponentLink4Description=https://datasheet.octopart.com:443/TZMC30-GS08-Vishay-datasheet-21271070.pdf?src-supplier=Newark, ComponentLink4URL=https://datasheet.octopart.com:443/TZMC30-GS08-Vishay-datasheet-21271070.pdf?src-supplier=Newark, ComponentLink5Description=https://datasheet.octopart.com:443/TZMC30-GS08-Vishay-datasheet-7185.pdf?src-supplier=Newark, ComponentLink5URL=https://datasheet.octopart.com:443/TZMC30-GS08-Vishay-datasheet-7185.pdf?src-supplier=Newark, ComponentLink6Description=https://datasheet.octopart.com:443/TZMC30GS08-Vishay-datasheet-181484054.pdf?src-supplier=IHS, ComponentLink6URL=https://datasheet.octopart.com:443/TZMC30GS08-Vishay-datasheet-181484054.pdf?src-supplier=IHS, ComponentLink7Description=https://datasheet.octopart.com:443/TZMC30-GS08-Vishay-datasheet-78835411.pdf?src-supplier=Farnell, ComponentLink7URL=https://datasheet.octopart.com:443/TZMC30-GS08-Vishay-datasheet-78835411.pdf?src-supplier=Farnell, ComponentLink8Description=https://datasheet.octopart.com:443/TZMC30-GS08-Vishay-datasheet-101751705.pdf?src-supplier=Future+Electronics, ComponentLink8URL=https://datasheet.octopart.com:443/TZMC30-GS08-Vishay-datasheet-101751705.pdf?src-supplier=Future+Electronics, ComponentLink9Description=https://datasheet.octopart.com:443/TZMC30-GS08-Vishay-datasheet-13137935.pdf?src-supplier=Future+Electronics, ComponentLink9URL=https://datasheet.octopart.com:443/TZMC30-GS08-Vishay-datasheet-13137935.pdf?src-supplier=Future+Electronics, ComponentLink10Description=https://datasheet.octopart.com:443/TZMC30-GS08-Vishay-datasheet-11549796.pdf?src-supplier=Future+Electronics, ComponentLink10URL=https://datasheet.octopart.com:443/TZMC30-GS08-Vishay-datasheet-11549796.pdf?src-supplier=Future+Electronics, ComponentLink11Description=https://datasheet.octopart.com:443/TZMC30-GS08-Vishay-datasheet-8835337.pdf?src-supplier=Future+Electronics, ComponentLink11URL=https://datasheet.octopart.com:443/TZMC30-GS08-Vishay-datasheet-8835337.pdf?src-supplier=Future+Electronics, ComponentLink12Description=https://datasheet.octopart.com:443/TZMC30-GS08-Vishay-datasheet-8372199.pdf?src-supplier=Future+Electronics, ComponentLink12URL=https://datasheet.octopart.com:443/TZMC30-GS08-Vishay-datasheet-8372199.pdf?src-supplier=Future+Electronics, ComponentLink13Description=https://datasheet.octopart.com:443/TZMC30-GS08-Vishay-datasheet-5314236.pdf?src-supplier=Future+Electronics, ComponentLink13URL=https://datasheet.octopart.com:443/TZMC30-GS08-Vishay-datasheet-5314236.pdf?src-supplier=Future+Electronics, ComponentLink14Description=https://datasheet.octopart.com:443/TZMC30-GS08-Vishay-datasheet-42917902.pdf?src-supplier=TME, ComponentLink14URL=https://datasheet.octopart.com:443/TZMC30-GS08-Vishay-datasheet-42917902.pdf?src-supplier=TME, ComponentLink15Description=http://sigma.octopart.com:80/rohs_statement/Vishay-company-15.pdf?src-supplier=Compliance+Statements, ComponentLink15URL=http://sigma.octopart.com:80/rohs_statement/Vishay-company-15.pdf?src-supplier=Compliance+Statements, Composition=Zener, Country of Origin="Germany, Japan", Element Configuration=Single, Export Control Classification Number (ECCN) Code=EAR99, Harmonized Tariff Schedule (HTS) Code=8541.10.00.50, Height=1.6mm, Impedance=80Ω, Introduction Date=2000-08-07, Lead Free="Lead Free", Length=3.7mm, Lifecycle Status=Production, Mount="Surface Mount", MPN=TZMC30-GS08, Number of Elements=1, Number of Terminals=2, Packaging="Cut Tape", Polarity=Unidirectional, Power Dissipation=500mW, Pricing 1="12500=0.0644, 25000=0.0562 (USD)", Radiation Hardening=No, REACH SVHC=Unaffected, Reference Voltage=30V, RoHS=Compliant, Stock 1=37500, Supplier 1="Arrow Electronics", Supplier Part Number 1=TZMC30-GS08, Voltage=30V, Voltage Tolerance=5%, Width=1.6mm, Zener Current=5mA, Zener Voltage=30V
D200: library part "Diode B340A", "Diode Schottky 3A/40V DO-214AB", MFR="Diodes Incorporated", Category="Diodes - Rectifiers - Single", Code_JEDEC=DO-214-AA, LatestRevisionDate=17-Jul-2002, LatestRevisionNote="Re-released for DXP Platform.", MPN=SS34, PackageReference=SMB, Published=8-Jun-2000, Publisher="Altium Limited"
D400: library part "LED 3mm", "LED RED SMD 0402", MPN=NCD0603R1
D500: library part "Diode F03", "1N4148 T4 SOD-123/1206 1N4148W", MFR=LinhKienChatLuong, Category=Diode, MPN=1N4148W
D600: library part "Diode B340A", "Diode Schottky 5A/40V DO-214AB", Code_JEDEC=DO-214-AA, LatestRevisionDate=17-Jul-2002, LatestRevisionNote="Re-released for DXP Platform.", MPN=SS54, PackageReference=SMB, Published=8-Jun-2000, Publisher="Altium Limited"
D800 D900 D901 D902 D903 D904 D905 D906: library part "Diode B340A", "Diode Schottky 3A/40V DO-214AB", Code_JEDEC=DO-214-AA, LatestRevisionDate=17-Jul-2002, LatestRevisionNote="Re-released for DXP Platform.", MPN=SS34, PackageReference=SMB, Published=8-Jun-2000, Publisher="Altium Limited"
F200: library part RKEF110, "PTC RESET FUSE 33V 1A SMD 1812", MFR="Littelfuse Inc.", MPN=KMC5S110RY33, Solder=WAVE
H700: library part MUP-C7801, "Nano Sim card Socket", MFR=OEM, MPN=MUP-C7801-2
IC: "XL6019E1 IC Boost 5A TO-263-5", MPN=XL6019E1
IC200: library part MK9019, "100V Input, Ultra-Low IQ, Synchronous Buck Converter", MPN=RY81020CP8
L200: library part Inductor, "Inductor SMD 3.3uH CD43-3R3 3.5*3*2.1mm", MPN=XRCD43-3R3M, Published=8-Jun-2000, Publisher="Altium Limited", Revision="July-2002: Re-released for DXP Platform."
L201: library part "Inductor Iron", "Inductor 10uH 7x7x4mm", MPN=YPRH0704-100M, LatestRevisionDate=17-Jul-2002, LatestRevisionNote="Re-released for DXP Platform.", PackageReference=AXIAL-0.9, Published=24-Mar-1999, Publisher="Altium Limited"
L202 L203: library part CBC2012T470M, "Inductor Ferrites 4A SMD 0603", Current - Saturation=120mA, Current Rating=150mA, DC Resistance (DCR)="7.54 Ohm Max", Frequency - Self Resonant=11MHz, Frequency - Test=2.52MHz, Inductance=200nH, Manufacturer="Taiyo Yuden", Operating Temperature="-40°C ~ 105°C", Package / Case="0805 (2012 Metric)", Q @ Freq=-, Supplier Part Number 1=587-1605-1-ND, Tolerance=±20%, Category="Inductors, Coils, Chokes", ComponentLink1Description=http://www.yuden.co.jp/ut/product/category/inductor/CBC2012T470M.pdf, ComponentLink1URL=http://www.yuden.co.jp/ut/product/category/inductor/CBC2012T470M.pdf, Manufacturer Part Number=CBC2012T470M, Material - Core=-, Mounting Type="Surface Mount", MPN=FBMJ1608HM230NT, Packaging="Cut Tape (CT)", Pricing 1="1=0.2, 10=0.188, 50=0.1762, 100=0.1645, 500=0.12926, 1000=0.10575 (USD)", RoHS="RoHS Compliant", Shielding=Unshielded, Size / Dimension="0.079\" L x 0.049\" W x 0.049\" H (2.00mm x 1.25mm x 1.25mm)", Stock 1=108934, Supplier 1=Digi-Key, Type=-
L501: library part FBMJ1608HM230NT, "Inductor Ferrites 4A SMD 0603", MFR="Taiyo Yuden", MPN=NC, Category="Ferrite Beads and Chips"
L502: library part CBC2012T470M, "47nH", Current - Saturation=120mA, Current Rating=150mA, DC Resistance (DCR)="7.54 Ohm Max", Frequency - Self Resonant=11MHz, Frequency - Test=2.52MHz, Inductance=200nH, Manufacturer="Taiyo Yuden", Operating Temperature="-40°C ~ 105°C", Package / Case="0805 (2012 Metric)", Q @ Freq=-, Supplier Part Number 1=587-1605-1-ND, Tolerance=±20%, Category="Inductors, Coils, Chokes", ComponentLink1Description=http://www.yuden.co.jp/ut/product/category/inductor/CBC2012T470M.pdf, ComponentLink1URL=http://www.yuden.co.jp/ut/product/category/inductor/CBC2012T470M.pdf, Manufacturer Part Number=CBC2012T470M, Material - Core=-, Mounting Type="Surface Mount", MPN=NC, Packaging="Cut Tape (CT)", Pricing 1="1=0.2, 10=0.188, 50=0.1762, 100=0.1645, 500=0.12926, 1000=0.10575 (USD)", RoHS="RoHS Compliant", Shielding=Unshielded, Size / Dimension="0.079\" L x 0.049\" W x 0.049\" H (2.00mm x 1.25mm x 1.25mm)", Stock 1=108934, Supplier 1=Digi-Key, Type=-
L601: library part CBC2012T470M, "INDUCTOR 33uH SMD CDRH127-330", Current - Saturation=120mA, Current Rating=150mA, DC Resistance (DCR)="7.54 Ohm Max", Frequency - Self Resonant=11MHz, Frequency - Test=2.52MHz, Inductance=47uH, Manufacturer="Taiyo Yuden", MPN=CDRH127-330, Operating Temperature="-40°C ~ 105°C", Package / Case="0805 (2012 Metric)", Q @ Freq=-, Supplier Part Number 1=587-1605-1-ND, Tolerance=±20%, Category="Inductors, Coils, Chokes", ComponentLink1Description=http://www.yuden.co.jp/ut/product/category/inductor/CBC2012T470M.pdf, ComponentLink1URL=http://www.yuden.co.jp/ut/product/category/inductor/CBC2012T470M.pdf, Manufacturer Part Number=CBC2012T470M, Material - Core=-, Mounting Type="Surface Mount", Packaging="Cut Tape (CT)", Pricing 1="1=0.2, 10=0.188, 50=0.1762, 100=0.1645, 500=0.12926, 1000=0.10575 (USD)", RoHS="RoHS Compliant", Shielding=Unshielded, Size / Dimension="0.079\" L x 0.049\" W x 0.049\" H (2.00mm x 1.25mm x 1.25mm)", Stock 1=108934, Supplier 1=Digi-Key, Type=-
L700 L701: library part CBC2012T470M, "INDUCTOR 200nH 20% 0805 SMD", Current - Saturation=120mA, Current Rating=150mA, DC Resistance (DCR)="7.54 Ohm Max", Frequency - Self Resonant=11MHz, Frequency - Test=2.52MHz, Inductance=200nH, MFR="Taiyo Yuden", Operating Temperature="-40°C ~ 105°C", Package / Case="0805 (2012 Metric)", Q @ Freq=-, Supplier Part Number 1=587-1605-1-ND, Tolerance=±20%, Category="Inductors, Coils, Chokes", ComponentLink1Description=http://www.yuden.co.jp/ut/product/category/inductor/CBC2012T470M.pdf, ComponentLink1URL=http://www.yuden.co.jp/ut/product/category/inductor/CBC2012T470M.pdf, Material - Core=-, Mounting Type="Surface Mount", MPN=FBMJ1608HM230NT, Packaging="Cut Tape (CT)", Pricing 1="1=0.2, 10=0.188, 50=0.1762, 100=0.1645, 500=0.12926, 1000=0.10575 (USD)", RoHS="RoHS Compliant", Shielding=Unshielded, Size / Dimension="0.079\" L x 0.049\" W x 0.049\" H (2.00mm x 1.25mm x 1.25mm)", Stock 1=108934, Supplier 1=Digi-Key, Type=-
MD500: library part LC76G, "Compact GNSS Module", MPN=SIM65M-C
P100: library part "Header 4X2", "Header, 4-Pin, Dual row", LatestRevisionDate=17-Jul-2002, LatestRevisionNote="Re-released for DXP Platform.", MPN=NC, Publisher="Altium Limited"
P300: library part "Header 3", "Diode Infrared Receiver 38Khz", LatestRevisionDate=17-Jul-2002, LatestRevisionNote="Re-released for DXP Platform.", MPN=VS1838B, Publisher="Altium Limited"
P600 P800: library part "Header 2", "Header, 2-Pin", LatestRevisionDate=17-Jul-2002, LatestRevisionNote="Re-released for DXP Platform.", Publisher="Altium Limited"
  P600: MPN=NC
P601 P602: library part "Header 2", "Header, 2-Pin", MPN=NC, LatestRevisionDate=17-Jul-2002, LatestRevisionNote="Re-released for DXP Platform.", Publisher="Altium Limited"
P700: library part USB-M, Value1=NC
Q700: library part 2N3906, "Mosfet P Channel", MFR="Alpha & Omega Semiconductor Inc.", Category="Transistors - FETs, MOSFETs - Single", ComponentLink1Description="Manufacturer Link", ComponentLink1URL=http://www.fairchildsemi.com/, ComponentLink2Description=Datasheet, ComponentLink2URL=http://www.fairchildsemi.com/ds/2N%2F2N3906.pdf, DatasheetVersion=1997, LatestRevisionDate=15-Jan-2003, LatestRevisionNote="PCB Footprint 'BCY-W3/D4.7' replaced", MPN=AO3415, PackageDescription="TO, Flat Index; 3 In-Line, Axial Leads; Body Dia. 4.5mm; Leads 0.51 x 0.48 mm (max)", PackageReference=TO-92A, PackageVersion=Sep-1998, Published=8-Jun-2000, Publisher="Altium Limited"
Q701: library part 2N3904, "Trans C1815 NPN 0.15A/50V SMD SOT23", MFR=LinhKienChatLuong, MPN=2SC1815, Category="Transistor NPN", ComponentLink1Description="Manufacturer Link", ComponentLink1URL=http://www.fairchildsemi.com/, ComponentLink2Description=Datasheet, ComponentLink2URL=http://www.fairchildsemi.com/ds/2N%2F2N3904.pdf, DatasheetVersion=1997, LatestRevisionDate=15-Jan-2003, LatestRevisionNote="PCB Footprint 'BCY-W3/D4.7' replaced", PackageDescription="TO, Flat Index; 3 In-Line, Axial Leads; Body Dia. 4.5mm; Leads 0.51 x 0.48 mm (max)", PackageReference=TO-92A, PackageVersion=Sep-1998, Published=8-Jun-2000, Publisher="Altium Limited"
R: library part Res1, "RES 2.7K OHM 5% 1/8W 0402", MFR=YAGEO, MPN=RC0402JR-072K7L, Category="Chip Resistor - Surface Mount", LatestRevisionDate=17-Jul-2002, LatestRevisionNote="Re-released for DXP Platform.", PackageDescription="Axial Device, Thru-Hole; 2 Leads; 0.3 in Pin Spacing", PackageReference=AXIAL-0.3, Published=8-Jun-2000, Publisher="Altium Limited"
R100 R102 R404 R604: library part Res1, "RES 1K OHM 1% 1/8W 0402", MPN=RC0402FR-071KL, LatestRevisionDate=17-Jul-2002, LatestRevisionNote="Re-released for DXP Platform.", PackageReference=AXIAL-0.3, Published=8-Jun-2000, Publisher="Altium Limited"
R200: library part Res1, "RES 68K OHM 5% 1/8W 0402", MPN=RC0402FR-0768KL, LatestRevisionDate=17-Jul-2002, LatestRevisionNote="Re-released for DXP Platform.", PackageReference=AXIAL-0.3, Published=8-Jun-2000, Publisher="Altium Limited"
R201: library part Res1, "RES 20K OHM 1% 1/8W 0402", MPN=RC0402FR-0720KL, LatestRevisionDate=17-Jul-2002, LatestRevisionNote="Re-released for DXP Platform.", PackageReference=AXIAL-0.3, Published=8-Jun-2000, Publisher="Altium Limited"
R202: library part Res1, "RES 20K OHM 5% 1/8W 0402", MFR="Stackpole Electronics Inc", MPN=RC0402FR-0720KL, Category="Chip Resistor - Surface Mount", LatestRevisionDate=17-Jul-2002, LatestRevisionNote="Re-released for DXP Platform.", PackageReference=AXIAL-0.3, Published=8-Jun-2000, Publisher="Altium Limited"
R203: library part Res1, "RES 5.1K OHM 5% 1/8W 0402", MFR="Stackpole Electronics Inc", MPN=AC0402FR-075K1L, Category="Chip Resistor - Surface Mount", LatestRevisionDate=17-Jul-2002, LatestRevisionNote="Re-released for DXP Platform.", PackageReference=AXIAL-0.3, Published=8-Jun-2000, Publisher="Altium Limited"
R204: library part Res1, "RES 20K OHM 1% 1/8W 0402", MFR=YAGEO, MPN=RC0402FR-0720KL, Category="Chip Resistor - Surface Mount", LatestRevisionDate=17-Jul-2002, LatestRevisionNote="Re-released for DXP Platform.", PackageReference=AXIAL-0.3, Published=8-Jun-2000, Publisher="Altium Limited"
R300: library part Res1, "RES 10K OHM 5% 1/8W 0402", MFR=Yageo, MPN=RC0402JR-0710KL, LatestRevisionDate=17-Jul-2002, LatestRevisionNote="Re-released for DXP Platform.", PackageReference=AXIAL-0.3, Published=8-Jun-2000, Publisher="Altium Limited"
R400 R401 R405 R607: library part Res1, "Resistor 100K 1/8W 1% 0402", MPN=RC0402FR-07100KL, LatestRevisionDate=17-Jul-2002, LatestRevisionNote="Re-released for DXP Platform.", PackageReference=AXIAL-0.3, Published=8-Jun-2000, Publisher="Altium Limited"
R402: library part Res1, "Resistor", LatestRevisionDate=17-Jul-2002, LatestRevisionNote="Re-released for DXP Platform.", PackageReference=AXIAL-0.3, Published=8-Jun-2000, Publisher="Altium Limited"
R403: library part Res1, "RES 0 OHM 1/8W 0402", MPN=CRCW04020000Z0EDC, LatestRevisionDate=17-Jul-2002, LatestRevisionNote="Re-released for DXP Platform.", PackageReference=AXIAL-0.3, Published=8-Jun-2000, Publisher="Altium Limited"
R500: library part RC0402FR-071KL, "RES 1K OHM 1% 1/8W 0402", MFR=YAGEO, Power Rating=1/16W, Tolerance=1%, Voltage Rating=50V, Category=0402, MPN=RC0402FR-071KL
R501: library part RC0402FR-071KL, "RES 1K OHM 1% 1/8W 0402", MFR=YAGEO, MPN=RC0402FR-131KL, Power Rating=1/16W, Tolerance=1%, Voltage Rating=50V, Category=0402
R502: library part Res1, "RES 100 OHM 1% 1/8W 0402", MFR="Vishay Dale", MPN=RC0402FR-7W100RL, Category="Chip Resistor - Surface Mount", LatestRevisionDate=17-Jul-2002, LatestRevisionNote="Re-released for DXP Platform.", PackageReference=AXIAL-0.3, Published=8-Jun-2000, Publisher="Altium Limited"
R503: library part RC0402JR-0710KL, "RES 10K OHM 5% 1/8W 0402", MFR=YAGEO, Category="Chip Resistor - Surface Mount", MPN=RC0402JR-0710KL
R600: library part Res1, "RES 5.1K OHM 5% 1/8W 0402", MPN=RC0402JR-075K1L, LatestRevisionDate=17-Jul-2002, LatestRevisionNote="Re-released for DXP Platform.", PackageReference=AXIAL-0.3, Published=8-Jun-2000, Publisher="Altium Limited"
R601 R602 R605 R608 R705 R707 R803 R804 R806 R901: library part Res1, "RES 10K OHM 5% 1/8W 0402", MPN=RC0402JR-0710KL, LatestRevisionDate=17-Jul-2002, LatestRevisionNote="Re-released for DXP Platform.", PackageReference=AXIAL-0.3, Published=8-Jun-2000, Publisher="Altium Limited"
R603: library part "Res 1W", "Res 1W 0.1R 1% SMD 2512", MPN=RL2512FK-070R1L
R606: library part Res1, "RES 330 OHM 1% 1/8W 0402", MPN=RC0402FR-07330RL, LatestRevisionDate=17-Jul-2002, LatestRevisionNote="Re-released for DXP Platform.", PackageReference=AXIAL-0.3, Published=8-Jun-2000, Publisher="Altium Limited"